# Altium PCB PCB1.PcbDoc (part 2 of 5)
Units mm, origin at the board's own origin, x right, y up, seen from the top; angles counter-clockwise.
Board outline 130 x 90 mm, 4 copper layers (Top Layer, Int 1 (GND), Int 2 (PWR), Bottom Layer), stack 1.466 mm thick; 419 components, 281 nets, 1355 pads, 522 vias.
Unrouted connection lines stored in the file: 26.
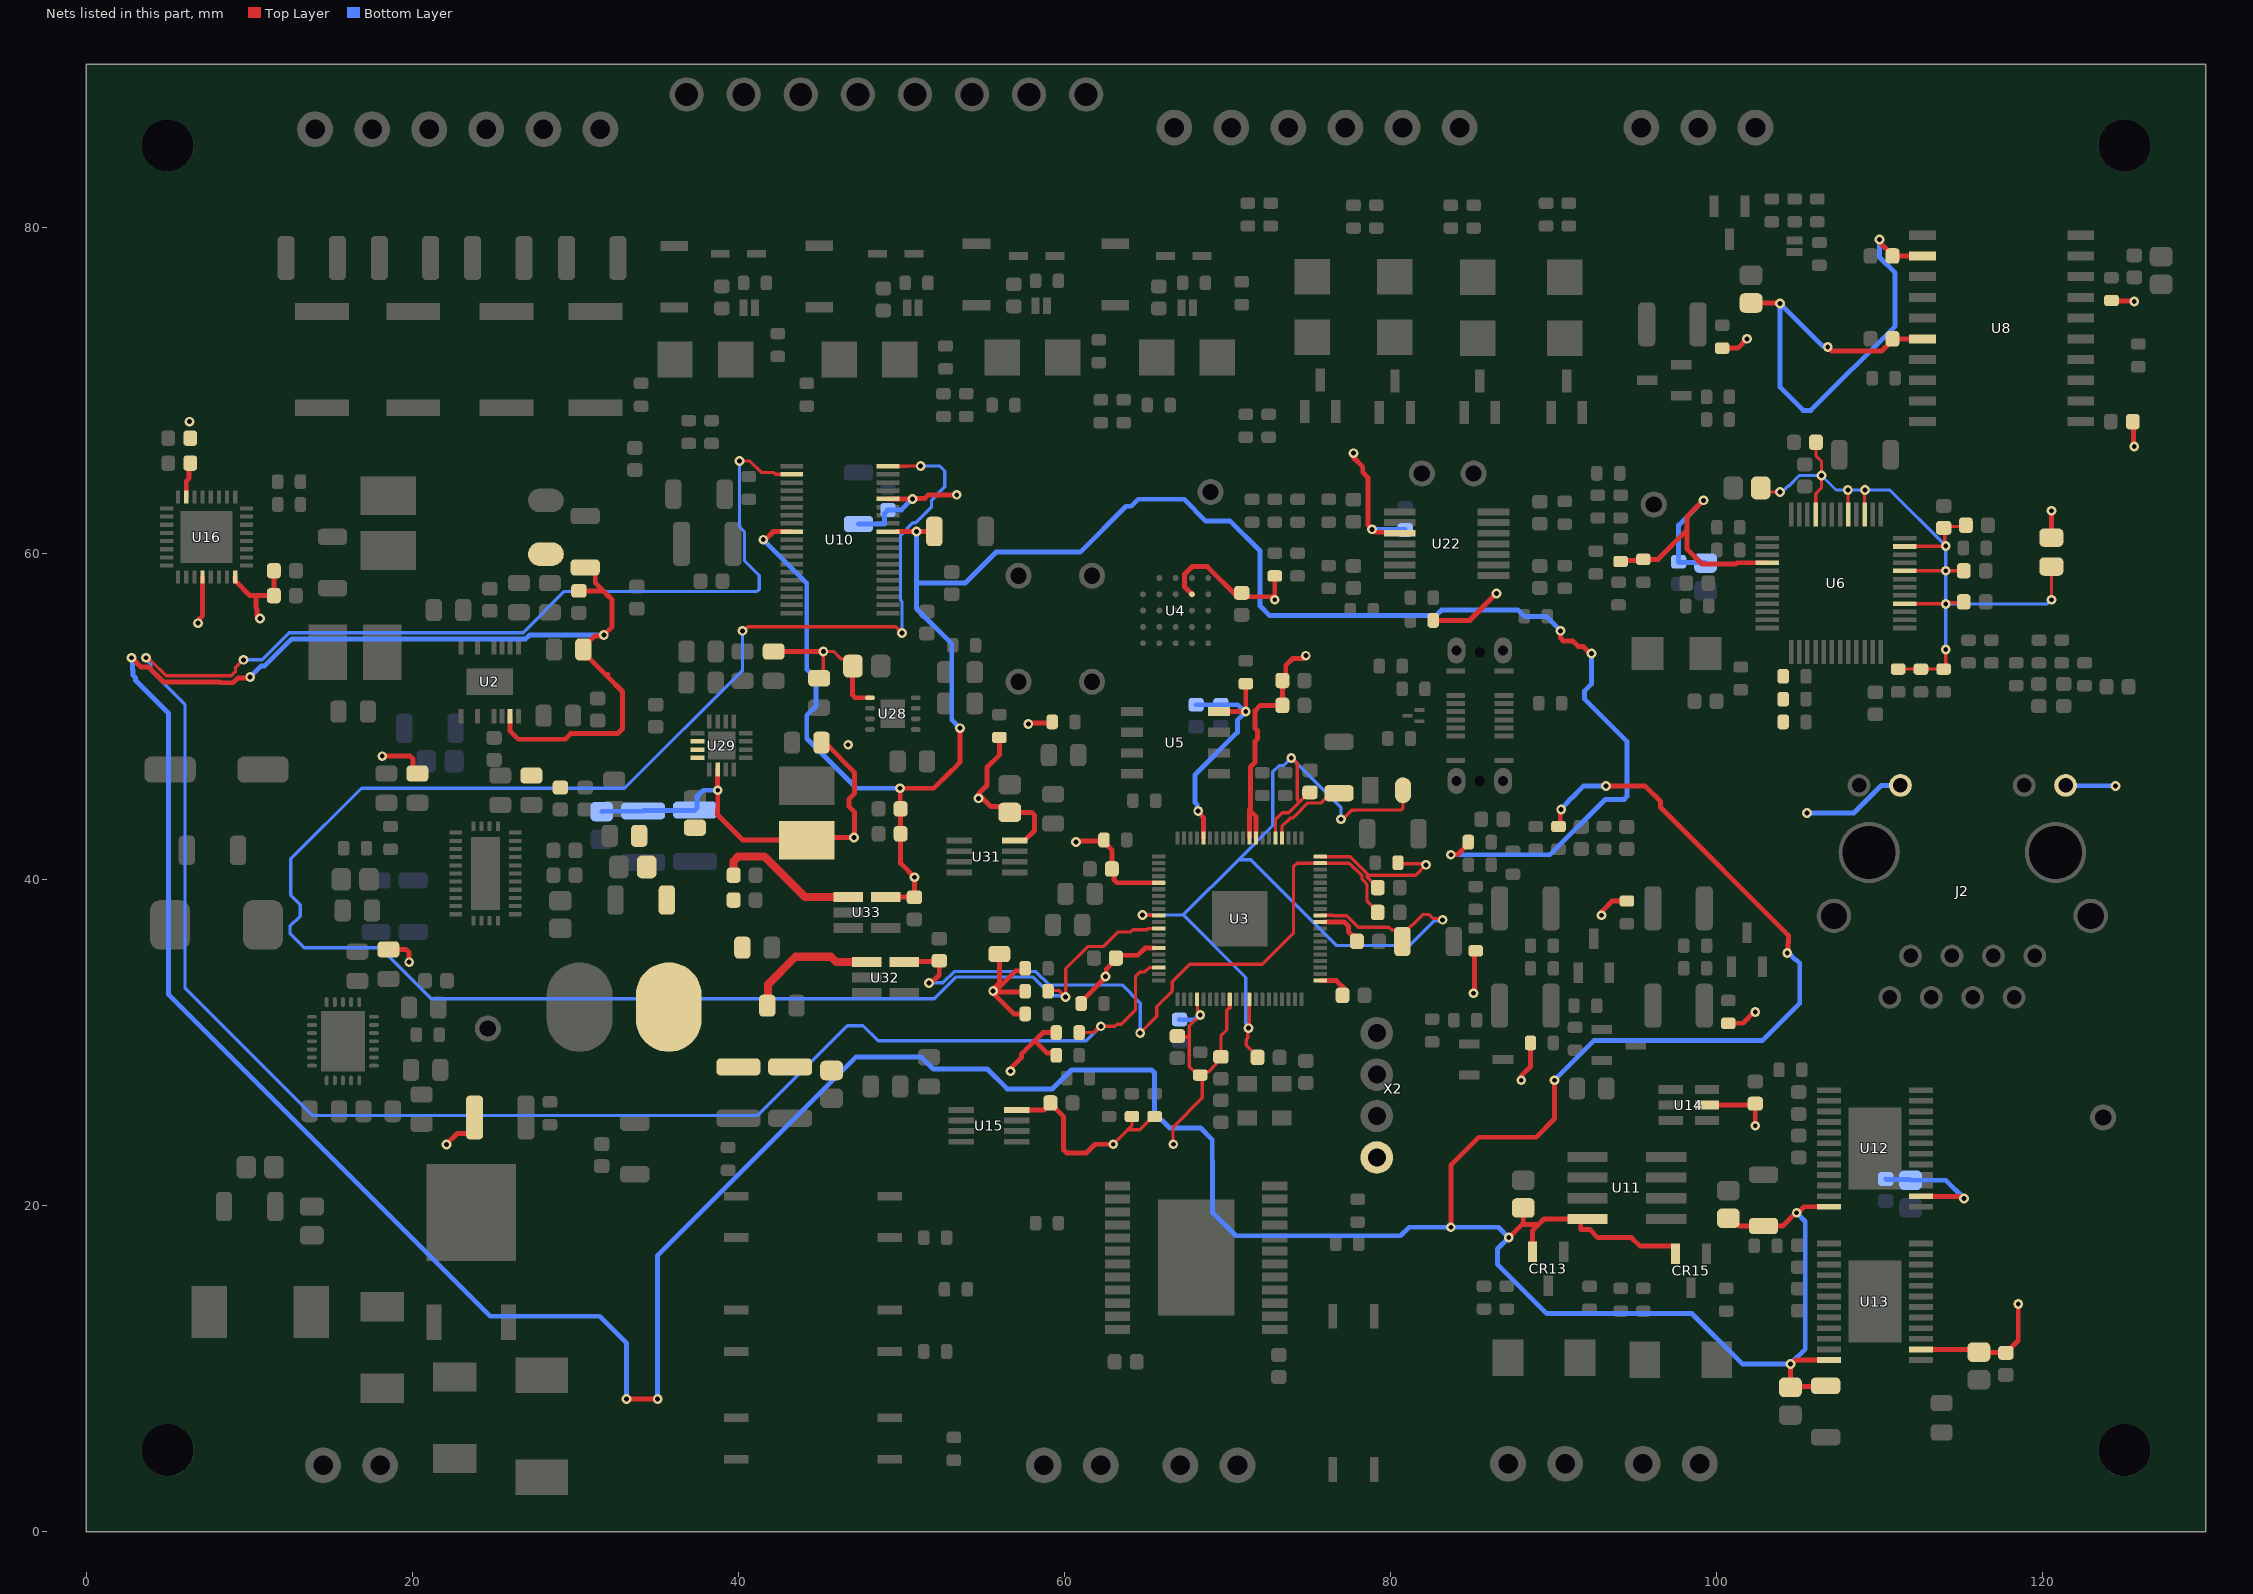
[diagram p4: the nets of this part, all layers, seen from the top]

## Footprints (in the part's own frame and the unit in brackets; to place one, negate y for a bottom-side part, rotate by r counter-clockwise, add the part's x,y. Pads: shape width x height; smd on the part's side, far side on the other; paste and mask are expansions set on the pad) (continued)
"CON: DG350-3.5-03P" [mm]
  round 2.2 hole 1.2: 1(-3.5,0) 2(0,0) 3(3.5,0)
  round 0.5 on Top Overlay: ""(-4.85,-2.9)
  silkscreen extent -5.35,-3.4 5.35,3.4, body extent -5.75,-3.4 5.75,3.4, height 8.4
"CON: DG350-3.5-06P" [mm]
  round 2.2 hole 1.2: 1(-8.75,0) 2(-5.25,0) 3(-1.75,0) 4(1.75,0) 5(5.25,0) 6(8.75,0)
  round 0.5 on Top Overlay: ""(-10.1,-2.9)
  silkscreen extent -10.6,-3.4 10.6,3.4, body extent -11,-3.4 11,3.4, height 8.42
"CON: JUMPER x1" [mm]
  rect 0.5x1 smd: 1(0,0) 2(0.7,0)
  silkscreen extent -0.45,-0.7 1.15,0.7
"CON: WF-04" [mm]
  round 2 hole 1.1: 1(0,0) 2(2.54,0) 3(5.08,0) 4(7.62,0)
  round 0.5 on Mech1: ""(-0.8,2)
  silkscreen extent -1.4,-3.3 8.9,2.6, body extent -1.33,-3.27 8.83,2.53, height 11.66
CONN12_TMJD4012BENL_TAL [mil]
  round 55 hole 35 paste-99999 mask+0: 1(0,0) 2(-50,-100) 3(-100,0) 4(-150,-100) 5(-200,0) 6(-250,-100) 7(-300,0) 8(-350,-100) 9(74.41,411.81) 10(-25.59,411.81) 11(-324.41,411.81) 12(-424.41,411.81)
  round 148 hole 128 paste-99999 mask-74: 13(-400,250) 15(50,250)
  round 83 hole 63 paste-99999 mask-41.5: 14(-485.04,96.85) 16(135.04,96.85)
  silkscreen extent -495,-155 251,520
CONN_USB4145-03-0230-C_GCT [mil]
  oval 63x43 hole 24 slot 43 at 0 deg paste-99999 mask-31.5: 17(-157.48,56.3) 18(157.48,56.3) 19(-157.48,-56.3) 20(157.48,-56.3)
  round 26 hole 26 unplated paste-99999 mask+0: 21(-157.48,0) S_1_H1(153.48,0)
  rect 12x45 smd paste+0 mask+0: A1(-108.27,58.46) A4(-49.21,58.46) A5(-29.53,58.46) A6(-9.84,58.46) A7(9.84,58.46) A8(29.53,58.46) A9(49.21,58.46) A12(108.27,58.46) B1(108.27,-58.46) B4(49.21,-58.46) B5(29.53,-58.46) B6(9.84,-58.46) B7(-9.84,-58.46) B8(-29.53,-58.46) B9(-49.21,-58.46) B12(-108.27,-58.46)
  silkscreen extent -266,-67 181,73
D0008A-IPC_A [mm]
  rect 2.469x0.622 smd paste+0 mask+0: 1(-2.414,1.905) 2(-2.414,0.635) 3(-2.414,-0.635) 4(-2.414,-1.905) 5(2.414,-1.905) 6(2.414,-0.635) 7(2.414,0.635) 8(2.414,1.905)
  silkscreen extent -4.32,-2.45 0.68,2.45
D_POWERDI123 [mm]
  oval 1.45x2.2 smd: 1(-1.65,0) 2(1.65,0)
DBT38_TEX [mil]
  rect 55.28x11 smd paste+0 mask+0: 1(-116.14,177.17) 2(-116.14,157.48) 3(-116.14,137.8) 4(-116.14,118.11) 5(-116.14,98.43) 6(-116.14,78.74) 7(-116.14,59.06) 8(-116.14,39.37) 9(-116.14,19.69) 10(-116.14,0) 11(-116.14,-19.68) 12(-116.14,-39.37) 13(-116.14,-59.06) 14(-116.14,-78.74) 15(-116.14,-98.43) 16(-116.14,-118.11) 17(-116.14,-137.8) 18(-116.14,-157.48) 19(-116.14,-177.17) 20(116.14,-177.17) 21(116.14,-157.48) 22(116.14,-137.8) 23(116.14,-118.11) 24(116.14,-98.43) 25(116.14,-78.74) 26(116.14,-59.06) 27(116.14,-39.37) 28(116.14,-19.68) 29(116.14,0) 30(116.14,19.69) 31(116.14,39.37) 32(116.14,59.06) 33(116.14,78.74) 34(116.14,98.43) 35(116.14,118.11) 36(116.14,137.8) 37(116.14,157.48) 38(116.14,177.17)
  silkscreen extent -164,-198 164,198, body extent -130,-193 130,193, height 47
DBV0005A-IPC_A [mm]
  rect 1.805x0.612 smd paste+0 mask+0: 1(-1.15,0.95) 2(-1.15,0) 3(-1.15,-0.95) 4(1.15,-0.95) 5(1.15,0.95)
  silkscreen extent -3.03,-1.7 1.4,1.7
DBV6 [mil]
  rect 58x22 smd paste-29 mask-29: 1(-44,37.4) 2(-44,0) 3(-44,-37.4) 4(44,-37.4) 5(44,0) 6(44,37.4)
  silkscreen extent -9,-60 9,60, body extent -59,-60 59,60, height 57
DCT8 [mil]
  rect 61.5x14 smd paste-30.75 mask-31: 1(-66.75,38.39) 2(-66.75,12.8) 3(-66.75,-12.8) 4(-66.75,-38.39) 5(66.75,-38.39) 6(66.75,-12.8) 7(66.75,12.8) 8(66.75,38.39)
  silkscreen extent -57,-62 57,62, body extent -84,-62 84,62, height 51
DO-214AASMB_J-BEND_LTF [mm]
  rect 1.874x2.234 smd paste+0 mask+0: 1(-2.207,0) 2(2.207,0)
  Top Layer keep-out region: -1.219,-1.918 -1.219,1.918 1.219,1.918 1.219,-1.918
  Keep-Out Layer region: -1.219,-1.918 -1.219,1.918 1.219,1.918 1.219,-1.918
  silkscreen extent -4.11,-2.1 2.5,2.1
DPAK_STM [mil]
  rect 36.97x86.56 smd paste+0 mask+0: 1(-90,-214.5) 3(90,-214.5)
  rect 215x235 smd paste+0 mask+0: 2(0,50.5)
  silkscreen extent -135,-166 135,127, body extent -130,-244 130,154, height 94
DRB0008A [mm]
  oval 0.6x0.3 smd paste+0 mask+0.051: 1(-1.4,0.975) 2(-1.4,0.325) 3(-1.4,-0.325) 4(-1.4,-0.975) 5(1.4,-0.975) 6(1.4,-0.325) 7(1.4,0.325) 8(1.4,0.975)
  rect 1.5x1.75 smd paste-0.862 mask+0.051: 9(0,0)
  Top Layer region: -0.185,-1.5 -0.465,-1.5 -0.465,-0.875 -0.75,-0.875 -0.75,0.875 -0.465,0.875 -0.465,1.5 -0.185,1.5 -0.185,0.875 0.185,0.875 0.185,1.5 0.465,1.5 0.465,0.875 0.75,0.875 0.75,-0.875 0.465,-0.875 0.465,-1.5 0.185,-1.5 0.185,-0.875 -0.185,-0.875
  silkscreen extent -1.73,-1.73 1.73,1.73
DRT3 [mm]
  rect 0.22x0.6 smd paste+0 mask+0: 1(-0.35,-0.371) 2(0.35,-0.371) 3(0,0.371)
  silkscreen extent -1.92,-0.65 0.65,0.55, body extent -0.52,-0.52 0.52,0.52, height 0.5
FUSE_PTS1206_EAT [mm]
  rect 0.634x1.703 smd paste+0 mask+0: 1(-1.886,0) 2(1.886,0)
  silkscreen extent -1.29,-1.03 1.29,1.03
L_0805 [mm] "Chip Inductor, 2-Leads, Body 2.00x1.25mm, IPC Medium Density"
  rrect50% 1.13x1.47 smd: 1(-0.885,0) 2(0.885,0)
  body extent -1.1,-0.72 1.1,0.72, height 1
L_AOTA_B201610 [mm]
  rect 1x1.6 smd: 1(-1,0)
  oval 1x1.6 smd: 2(1,0)
  silkscreen extent -1.35,1.05 -0.75,1.05
L_XFL4020 [mm]
  rect 2.37x3.4 smd: 1(-1.675,0) 2(1.675,0)
  silkscreen extent -2,-2 2,2
L_XGL4020 [mm]
  rect 2.37x3.4 smd: 1(-1.675,0) 2(1.675,0)
  silkscreen extent -2,-2 2,2
L_XGL6030 [mm]
  oval 4.04x5.5 smd: 1(-2.755,-0.6) 2(2.715,-0.6)
  silkscreen extent -3.27,-3.96 3.24,2.75
LED_PLCC2_3528 [mm] "Chip Capacitor, 2-Leads, Body 3.20x2.50mm, IPC Medium Density"
  rrect50% 1.05x2.7 smd: 1(-1.575,0) 2(1.575,0)
  silkscreen extent -1.91,-1.25 0.65,1.52, body extent -1.8,-1.4 1.8,1.4, height 2.7
MSE_16A_ADI [mil]
  rect 35x12 smd paste+0 mask+0: 1(-83,68.95) 3(-83,29.55) 5(-83,-9.85) 6(-83,-29.55) 7(-83,-49.25) 8(-83,-68.95) 9(83,-68.95) 10(83,-49.25) 11(83,-29.55) 12(83,-9.85) 14(83,29.55) 16(83,68.95)
  rect 65x112 smd paste-55.5 mask+0: 17(0,0)
  silkscreen extent -123,-84 57,84, body extent -87,-79 87,79, height 43
POWERSSO-24_STM [mil]
  rect 60.56x21.97 smd paste+0 mask+0: 1(-190,173.25) 2(-190,141.75) 3(-190,110.25) 4(-190,78.75) 5(-190,47.25) 6(-190,15.75) 7(-190,-15.75) 8(-190,-47.25) 9(-190,-78.75) 10(-190,-110.25) 11(-190,-141.75) 12(-190,-173.25) 13(190,-173.25) 14(190,-141.75) 15(190,-110.25) 16(190,-78.75) 17(190,-47.25) 18(190,-15.75) 19(190,15.75) 20(190,47.25) 21(190,78.75) 22(190,110.25) 23(190,141.75) 24(190,173.25)
  rect 185x280 smd paste-139.5 mask+0: 25(0,0)
  silkscreen extent -240,-212 240,212, body extent -206,-206 206,206, height 97
PW0014A-IPC_A [mm]
  rect 1.955x0.421 smd paste+0 mask+0: 1(-2.875,1.95) 2(-2.875,1.3) 3(-2.875,0.65) 4(-2.875,0) 5(-2.875,-0.65) 6(-2.875,-1.3) 7(-2.875,-1.95) 8(2.875,-1.95) 9(2.875,-1.3) 10(2.875,-0.65) 11(2.875,0) 12(2.875,0.65) 13(2.875,1.3) 14(2.875,1.95)
  silkscreen extent -4.57,-2.5 1.4,2.5
QFN40P1000X1000X85-81N [mm]
  rrect25% 0.81x0.25 smd: 1(-4.95,3.8) 2(-4.95,3.4) 3(-4.95,3) 4(-4.95,2.6) 5(-4.95,2.2) 6(-4.95,1.8) 7(-4.95,1.4) 8(-4.95,1) 9(-4.95,0.6) 10(-4.95,0.2) 11(-4.95,-0.2) 12(-4.95,-0.6) 13(-4.95,-1) 14(-4.95,-1.4) 15(-4.95,-1.8) 16(-4.95,-2.2) 17(-4.95,-2.6) 18(-4.95,-3) 19(-4.95,-3.4) 20(-4.95,-3.8) 41(4.95,-3.8) 42(4.95,-3.4) 43(4.95,-3) 44(4.95,-2.6) 45(4.95,-2.2) 46(4.95,-1.8) 47(4.95,-1.4) 48(4.95,-1) 49(4.95,-0.6) 50(4.95,-0.2) 51(4.95,0.2) 52(4.95,0.6) 53(4.95,1) 54(4.95,1.4) 55(4.95,1.8) 56(4.95,2.2) 57(4.95,2.6) 58(4.95,3) 59(4.95,3.4) 60(4.95,3.8)
  rrect25% 0.25x0.81 smd: 21(-3.8,-4.95) 22(-3.4,-4.95) 23(-3,-4.95) 24(-2.6,-4.95) 25(-2.2,-4.95) 26(-1.8,-4.95) 27(-1.4,-4.95) 28(-1,-4.95) 29(-0.6,-4.95) 30(-0.2,-4.95) 31(0.2,-4.95) 32(0.6,-4.95) 33(1,-4.95) 34(1.4,-4.95) 35(1.8,-4.95) 36(2.2,-4.95) 37(2.6,-4.95) 38(3,-4.95) 39(3.4,-4.95) 40(3.8,-4.95) 61(3.8,4.95) 62(3.4,4.95) 63(3,4.95) 64(2.6,4.95) 65(2.2,4.95) 66(1.8,4.95) 67(1.4,4.95) 68(1,4.95) 69(0.6,4.95) 70(0.2,4.95) 71(-0.2,4.95) 72(-0.6,4.95) 73(-1,4.95) 74(-1.4,4.95) 75(-1.8,4.95) 76(-2.2,4.95) 77(-2.6,4.95) 78(-3,4.95) 79(-3.4,4.95) 80(-3.8,4.95)
  rect 3.4x3.4 smd paste-0.62: 81(0,0)
  silkscreen extent -6.06,-5 5,5, body extent -5,-5 5,5, height 0.9
R_0603 [mm] "Chip Resistor, 2-Leads, Body 1.60x0.80mm, IPC Medium Density"
  rrect50% 0.7x0.9 smd: 1(-0.7,0) 2(0.7,0)
  body extent -0.85,-0.45 0.85,0.45, height 0.55
R_0805 [mm] "Chip Resistor, 2-Leads, Body 2.00x1.25mm, IPC Medium Density"
  rrect50% 1x1.35 smd: 1(-0.9,0) 2(0.9,0)
  silkscreen extent -0.1,-0.58 0.1,0.58, body extent -1.05,-0.67 1.05,0.67, height 0.6
RE_24_ADI [mil]
  rect 57.56x13.97 smd paste+0 mask+0: 1(-111,140.75) 2(-111,115.16) 3(-111,89.57) 4(-111,63.98) 5(-111,38.39) 6(-111,12.79) 7(-111,-12.8) 8(-111,-38.39) 9(-111,-63.98) 10(-111,-89.57) 11(-111,-115.16) 12(-111,-140.75) 13(111,-140.75) 14(111,-115.16) 15(111,-89.57) 16(111,-63.98) 17(111,-38.39) 18(111,-12.8) 19(111,12.79) 20(111,38.39) 21(111,63.98) 22(111,89.57) 23(111,115.16) 24(111,140.75)
  rect 128x198 smd paste-98.5 mask+0: 25(0,0)
  silkscreen extent -160,-160 160,160, body extent -126,-156 126,156, height 47
RES_0FKEGHP_VIS [mil]
  rect 39.87x130 smd paste+0 mask+0: 1(-115.94,0) 2(115.94,0)
  Top Layer keep-out region: -90,-63 -90,63 90,63 90,-63
  Keep-Out Layer region: -90,-65 -90,65 90,65 90,-65
  silkscreen extent -84,-70 84,70, body extent -128,-65 128,65, height 28
RGT16_1P7X1P7 [mm]
  rect 0.85x0.28 smd paste+0 mask+0: 1(-1.475,0.75) 2(-1.475,0.25) 3(-1.475,-0.25) 4(-1.475,-0.75) 9(1.475,-0.75) 10(1.475,-0.25) 11(1.475,0.25) 12(1.475,0.75)
  rect 0.28x0.85 smd paste+0 mask+0: 5(-0.75,-1.475) 6(-0.25,-1.475) 7(0.25,-1.475) 8(0.75,-1.475) 13(0.75,1.475) 14(0.25,1.475) 15(-0.25,1.475) 16(-0.75,1.475)
  rect 1.7x1.7 smd paste-0.85 mask-0.838: 17(0,0)
  silkscreen extent -1.96,-1.96 2.41,1.96, body extent -1.63,-1.63 1.63,1.63, height 1
RHF0024A [mm]
  oval 0.6x0.24 smd paste+0 mask+0.051: 1(-1.9,1.5) 2(-1.9,1) 3(-1.9,0.5) 4(-1.9,0) 5(-1.9,-0.5) 6(-1.9,-1) 7(-1.9,-1.5) 13(1.9,-1.5) 14(1.9,-1) 15(1.9,-0.5) 16(1.9,0) 17(1.9,0.5) 18(1.9,1) 19(1.9,1.5)
  oval 0.24x0.6 smd paste+0 mask+0.051: 8(-1,-2.4) 9(-0.5,-2.4) 10(0,-2.4) 11(0.5,-2.4) 12(1,-2.4) 20(1,2.4) 21(0.5,2.4) 22(0,2.4) 23(-0.5,2.4) 24(-1,2.4)
  rect 2.7x3.7 smd paste-1.837 mask+0.051: 25(0,0)
  silkscreen extent -2.2,-2.7 2.2,2.7
RNP0030B [mm]
  rect 0.75x0.25 smd paste+0 mask+0.051: 1(-1.825,2.5) 2(-1.825,2) 3(-1.825,1.5) 4(-1.825,1) 5(-1.825,0.5) 6(-1.825,0) 7(-1.825,-0.5) 8(-1.825,-1) 9(-1.825,-1.5) 10(-1.825,-2) 11(-1.825,-2.5) 16(1.825,-2.5) 17(1.825,-2) 18(1.825,-1.5) 19(1.825,-1) 20(1.825,-0.5) 21(1.825,0) 22(1.825,0.5) 23(1.825,1) 24(1.825,1.5) 25(1.825,2) 26(1.825,2.5)
  rect 0.25x0.6 smd paste+0 mask+0.051: 12(-0.75,-2.9) 13(-0.25,-2.9) 14(0.25,-2.9) 15(0.75,-2.9) 27(0.75,2.9) 28(0.25,2.9) 29(-0.25,2.9) 30(-0.75,2.9)
  rect 1.8x4.5 smd paste-2.237 mask+0.051: 31(0,0)
  silkscreen extent -2.17,-3.18 2.17,3.18
SMBJSERIES_LTF [mil]
  rect 85.59x86 smd paste+0 mask+0: 1(-73.11,0) 2(73.11,0)
  Top Layer keep-out region: -108,45 -108,75.5 108,75.5 108,45
  Top Layer keep-out region: -108,-75.5 -108,-45 108,-45 108,-75.5
  Top Layer keep-out region: -28.32,-45 -28.32,45 28.32,45 28.32,-45
  Keep-Out Layer region: -28.32,-45 -28.32,45 28.32,45 28.32,-45
  silkscreen extent -180,-82 115,82, body extent -110,-77 110,77, height 98
SMC [mm] "Molded Diode, 2-Leads, Body 6.85x5.90mm, IPC Medium Density"
  rrect50% 2.45x3.05 smd: 1(-2.85,0) 2(2.85,0)
  silkscreen extent -3.6,-3.15 4.38,3.15, body extent -3.77,-3.11 3.77,3.11, height 2.62
SOIC_2DFM_TEX [mil]
  rect 64.56x21.97 smd paste+0 mask+0: 1(-191,225) 2(-191,175) 3(-191,125) 4(-191,75) 5(-191,25) 6(-191,-25) 7(-191,-75) 8(-191,-125) 9(-191,-175) 10(-191,-225) 11(191,-225) 12(191,-175) 13(191,-125) 14(191,-75) 15(191,-25) 16(191,25) 17(191,75) 18(191,125) 19(191,175) 20(191,225)
  silkscreen extent -243,-260 243,260, body extent -209,-254 209,254, height 140
SOT23_SEM [mil]
  rect 22.36x51.56 smd paste+0 mask+0: 1(-37.4,-40) 2(37.4,-40) 3(0,40)
  silkscreen extent -65,-99 65,33, body extent -60,-52 60,52, height 44
SOT-23_3L_ONS [mil]
  rect 22.36x49.56 smd paste+0 mask+0: 1(-37.5,-41) 2(37.5,-41) 3(0,41)
  silkscreen extent -65,-99 65,33, body extent -60,-52 60,52, height 44
SOT-23_ONS [mil]
  rect 22.36x55.56 smd paste+0 mask+0: 1(-37.5,-38) 2(37.5,-38) 3(0,38)
  silkscreen extent -115,-57 65,32, body extent -60,-52 60,52, height 44
SOT-23TO-236_318-08_ONS [mil]
  rect 22.36x49.56 smd paste+0 mask+0: 1(-37.5,-41) 2(37.5,-41) 3(0,41)
  silkscreen extent -115,-57 65,33, body extent -60,-52 60,52, height 44
SW_B3F-1000 [mm]
  round 1.6 hole 1: 1(-3.25,2.25) 2(3.25,2.25) 3(-3.25,-2.25) 4(3.25,-2.25)
  silkscreen extent -4.1,-3.05 3.05,3.85, body extent -3.85,-3 3.85,3, height 4.3
TFBGA_128JVBIQ_WIN [mm]
  round 0.366 smd paste+0 mask+0: A2(-1,2) A3(0,2) A4(1,2) A5(2,2) B1(-2,1) B2(-1,1) B3(0,1) B4(1,1) B5(2,1) C1(-2,0) C2(-1,0) C3(0,0) C4(1,0) C5(2,0) D1(-2,-1) D2(-1,-1) D3(0,-1) D4(1,-1) D5(2,-1) E1(-2,-2) E2(-1,-2) E3(0,-2) E4(1,-2) E5(2,-2)
  silkscreen extent -3.3,-4.31 3.3,4.31, body extent -3.05,-4.05 3.05,4.05, height 1.2
XTAL_445I23D25M00000_CTS [mil]
  rect 77x79 smd paste+0 mask+0: 1(-70,0) 2(70,0)
  Top Layer keep-out region: -29.5,-41.5 -29.5,41.5 29.5,41.5 29.5,-41.5
  Top Layer keep-out region: -100.5,41.5 -100.5,65 100.5,65 100.5,41.5
  Top Layer keep-out region: -100.5,-65 -100.5,-41.5 100.5,-41.5 100.5,-65
  Keep-Out Layer region: -29.5,-41.5 -29.5,41.5 29.5,41.5 29.5,-41.5
  silkscreen extent -108,-72 108,72, body extent -113,-82 113,82, height 53

## Part data
CR1 CR2 CR4 CR5 CR6 CR7 CR16 CR17 CR18 CR19 F2: "No Description Available", Manufacturer_Name="Littelfuse Inc", Copyright="Copyright (C) 2026 Ultra Librarian. All rights reserved."
  CR1 CR2: Manufacturer_Part_Number=5.0SMDJ36CA
  CR4 CR5 CR6 CR7: Manufacturer_Part_Number=SMBJ12CA
  CR16 CR17 CR18 CR19: Manufacturer_Part_Number=SMBJ36CA
  F2: Manufacturer_Part_Number=0454005.MR
CR3: "Automotive 100 V, 10 A, DPAK Power Schottky Trench Rectifier", Manufacturer_Name=STMicroelectronics, Copyright="Copyright (C) 2026 Ultra Librarian. All rights reserved.", Datasheet=https://www.st.com/resource/en/datasheet/stpst10h100sb-y.pdf, Manufacturer_Part_Number=STPST10H100SBYTR, RefDes=RefDes, Type=Type
CR8 CR9 CR10 CR11: "No Description Available", Manufacturer_Name="Bourns Electronics", Copyright="Copyright (C) 2026 Ultra Librarian. All rights reserved.", Manufacturer_Part_Number=CDSOD323-T12C, RefDes=RefDes, Type=Type
CR12 CR14: "Description", Manufacturer_Name="Littelfuse Inc", Copyright="Copyright (C) 2025 Ultra Librarian. All rights reserved.", Manufacturer_Part_Number=SMBJ15A
CR13 CR15 U18 U19 U20 U21: "No Description Available", Manufacturer_Name=onsemi, Copyright="Copyright (C) 2026 Ultra Librarian. All rights reserved.", RefDes=RefDes, Type=Type
  CR13 CR15: Manufacturer_Part_Number=BAS70-04LT1G
  U18 U19 U20 U21: Manufacturer_Part_Number=BAS70LT1G
D3 D4 D5 D6 D7 D8 D9 D10 D11 D12: library part LED, AF=1, BV=0, BV_MAX=1e99, CJO=0, CJP=0, CTA=0, CTP=0, EG=1.11, FC=0.5, FCS=0.5, FV_MAX=1e99, IBV=0.001, IKF=0, IKR=0, IS=1e-14, ISR=1e-14, JSW=0, JTUN=0, JTUNSW=0, KEG=1, KF=0, LEVEL=1, MJSW=0.33, N=1, NBV=1, NR=1, NS=1, NTUN=30, PHP=1, RS=0, SimulationGenericComponent=True, TCV=0, TLEV=0, TLEVC=0, TM1=0, TM2=0, TNOM=27, TPB=0, TPHP=0, TRS=0, TRS2=0, TT=0, TTT1=0, TTT2=0, VJ=1, XTI=3, XTITUN=3
F1: CURRENT=2A, RESISTANCE=1m, SimulationGenericComponent=True
F3 F4 F5 F6: "No Description Available", Manufacturer_Name=Eaton, Copyright="Copyright (C) 2026 Ultra Librarian. All rights reserved.", Manufacturer_Part_Number=PTS120630V012
FB1: library part Resistor, "Resistor", SimulationGenericComponent=True, TC1=0, TC2=0
FB2: library part "Ferrite Chip", "SMT Ferrite Chip"
J1: "Description", Manufacturer_Name="Global Connector Technology", Copyright="Copyright (C) 2026 Ultra Librarian. All rights reserved.", Manufacturer_Part_Number=USB4145-03-0230-C, RefDes=RefDes, Type=Type
J2: "No Description Available", Manufacturer_Name="Taoglas Limited", Copyright="Copyright (C) 2026 Ultra Librarian. All rights reserved.", Manufacturer_Part_Number=TMJD4012BENL, RefDes=RefDes, Type="Modular Connector Jacks With Magnetics"
J3 J6 J7 J8 J9: library part Jumper_single, CommentText="\"Перемычка\""
J4: library part Connector_terminal_3pin, CurrentMax=10A, Manufacturer=Degson, PartNumber=DG350-3.5-03P-14, VoltageMax=300VAC, CommentText="\"Разъем\"", HelpURL=https://www.chipdip.ru/product/dg350-3.5-03p-12, Multichannel=3pin, Pitch=3.5mm, TypeConnector="Terminal connector", ValueManufacturerPartNumber="Terminal connector, 3pin, 3.5mm, 300VAC, 10A"
J5: library part Connector_terminal_8pin, CurrentMax=10A, Manufacturer=Degson, PartNumber=DG350-3.5-08P-14, VoltageMax=300VAC, CommentText="\"Разъем\"", HelpURL=https://www.compel.ru/infosheet/DEGSON/DG350-3.5-08P-14-00AH, Multichannel=6pin, Pitch=3.5mm, TypeConnector="Terminal connector", ValueManufacturerPartNumber="Terminal connector, 6pin, 3.5mm, 300VAC, 10A"
J10 J11 X1 X4 X5: library part Connector_terminal_2pin, CurrentMax=10A, Manufacturer=Degson, PartNumber=DG350-3.5-02P-14, VoltageMax=300VAC, CommentText="\"Разъем\"", HelpURL=https://www.chipdip.ru/product/dg350-3.5-02p-12, Multichannel=2pin, Pitch=3.5mm, TypeConnector="Terminal connector", ValueManufacturerPartNumber="Terminal connector, 2pin, 3.5mm, 300VAC, 10A"
MOSFET1 MOSFET2 MOSFET3 MOSFET4: library part TLP383GR-TPL,E, "Photocoupler (phototransistor output), DC input, 5000 Vrms, 4pin SO6L", Manufacturer_Name="Toshiba Electronic Devices & Storage Corp.", Number_devices_in_Package=1, Source_Package=TLP383, Copyright="Copyright (C) 2026 Ultra Librarian. All rights reserved.", Datasheet=https://toshiba.semicon-storage.com/info/docget.jsp?did=28830&prodName=TLP383, Manufacturer_Part_Number=TLP383(GR-TPL,E, RefDes=Refdes, Type=Type
R98 R99 R100 R101: "CRCW2512-HP 100 1K5 1% E67 E3", Manufacturer_Name=Vishay, Copyright="Copyright (C) 2026 Ultra Librarian. All rights reserved.", Datasheet=https://www.vishay.com/doc?20043, Manufacturer_Part_Number=CRCW25121K50FKEGHP, Type="Chip Resistor - Surface Mount"
SW1: "Tactile Switch SPST-NO Top Actuated Through Hole", Package=None, Availability="In Stock", Check_prices=https://www.snapeda.com/parts/B3F-1000/Omron+Electronics+Inc-EMC+Div/view-part/?ref=eda, MF=Omron, MP=B3F-1000, Price=None, Purchase-URL=https://pricing.snapeda.com/search/part/B3F-1000/?ref=eda, SnapEDA_Link=https://www.snapeda.com/parts/B3F-1000/Omron+Electronics+Inc-EMC+Div/view-part/?ref=snap
TP1 TP2 TP3 TP4 TP5 TP6: library part Connector_Test_Point, Manufacturer=Keystone, PartNumber=5001, HelpURL=https://www.digikey.com/product-detail/en/keystone-electronics/5001/36-5001-ND/255327, TypeConnector="Test point", ValueManufacturerPartNumber="Test point, Keystone, 5001"
U1: "4.2-V to 60-V, 150m&Omega;, 0.1-2.23A eFuse with integrated input reverse polarity protection 24-VQFN -40 to 125", Manufacturer_Name="Texas Instruments", Copyright="Copyright (C) 2026 Ultra Librarian. All rights reserved.", Datasheet=https://www.ti.com/lit/gpn/tps2660, Manufacturer_Part_Number=TPS26600RHFT, RefDes=RefDes, Type=TYPE
U2: library part LT8362EMSEPBF, "Low IQ Boost/SEPIC/Inverting Converter with 2A, 60V Switch", Manufacturer_Name="Analog Devices Inc", Copyright="Copyright (C) 2026 Ultra Librarian. All rights reserved.", Datasheet=https://www.analog.com/media/en/technical-documentation/data-sheets/lt8362.pdf, Manufacturer_Part_Number=LT8362EMSE#PBF, RefDes=RefDes, Type=Type
U3: "RP2350B Microcontroller from Raspberry Pi", ComponentLink1Description=Datasheet, ComponentLink1URL=https://datasheets.raspberrypi.com/rp2350/rp2350-datasheet.pdf
U4: "No Description Available", Manufacturer_Name=Winbond, Copyright="Copyright (C) 2026 Ultra Librarian. All rights reserved.", Manufacturer_Part_Number=W25Q128JVBIQ, RefDes=RefDes, Type=Memory
U5: "Description", Manufacturer_Name="AP Memory", Copyright="Copyright (C) 2025 Ultra Librarian. All rights reserved.", Manufacturer_Part_Number=APS6404L-3SQR-SN, RefDes=RefDes, Type=Type
U6: "Description", Manufacturer_Name=WIZnet, Copyright="Copyright (C) 2025 Ultra Librarian. All rights reserved.", Manufacturer_Part_Number=W5500, RefDes=RefDes, Type=Type
U7: "Dual 0.7-pF, 3.6-V, &plusmn;8-kV ESD protection diode with 5-A surge rating for USB 3.0 3-SOT-9X3 -40 to 85", Manufacturer_Name="Texas Instruments", Copyright="Copyright (C) 2026 Ultra Librarian. All rights reserved.", Manufacturer_Part_Number=TPD2EUSB30ADRTR, RefDes=RefDes, Type=Type
U8: "Low emissions, 5-kVrms, 12-Mbps isolated RS-485 transceiver with integrated DC/DC converter 20-SOIC -40 to 125", Manufacturer_Name="Texas Instruments", Copyright="Copyright (C) 2026 Ultra Librarian. All rights reserved.", Manufacturer_Part_Number=ISOW1432DFMR, RefDes=RefDes, Type="Digital Isolators"
U9: "Description", Manufacturer_Name=Semtech, Copyright="Copyright (C) 2025 Ultra Librarian. All rights reserved.", Manufacturer_Part_Number=SM712.TCT
U10: "16-bit, 500kSPS 8-channel single-supply SAR ADC with bipolar input ranges 38-TSSOP -40 to 125", Manufacturer_Name="Texas Instruments", Copyright="Copyright (C) 2026 Ultra Librarian. All rights reserved.", Manufacturer_Part_Number=ADS8688IDBTR, RefDes=RefDes, Type=Type
U11: "Dual, 40-V, 4.5-MHz, low-power operational amplifier 8-SOIC -40 to 125", Manufacturer_Name="Texas Instruments", Copyright="Copyright (C) 2025 Ultra Librarian. All rights reserved.", Manufacturer_Part_Number=OPA2991IDR, RefDes=RefDes, Type=TYPE
U12 U13: "Single Channel, 16-Bit, Current Source & Voltage Output DAC, HART Connectivity", Manufacturer_Name="Analog Devices Inc", Copyright="Copyright (C) 2026 Ultra Librarian. All rights reserved.", Datasheet=https://www.analog.com/media/en/technical-documentation/data-sheets/AD5412_5422.pdf, Manufacturer_Part_Number=AD5422BREZ, RefDes=RefDes, Type=Type
U14: "2-ch, 1.65-V to 5.5-V inverters 6-SOT-23 -40 to 125", Manufacturer_Name="Texas Instruments", Copyright="Copyright (C) 2025 Ultra Librarian. All rights reserved.", Manufacturer_Part_Number=SN74LVC2G04DBVR, RefDes=RefDes, Type=Type
U15 U31: "2-ch, 2-input 1.65-V to 5.5-V 32 mA drive strength AND gate 8-SSOP -40 to 125", Manufacturer_Name="Texas Instruments", Copyright="Copyright (C) 2026 Ultra Librarian. All rights reserved.", Manufacturer_Part_Number=SN74LVC2G08DCTR, RefDes=RefDes, Type=Type
U16: "Octal Industrial Digital Input with Diagnostics", Manufacturer_Name="Analog Devices Inc", Copyright="Copyright (C) 2026 Ultra Librarian. All rights reserved.", Manufacturer_Part_Number=MAX22190ATJ+, RefDes=RefDes, Type=Type
U17: "High efficiency, high-side switch with extended diagnostics and smart driving for capacitive loads", Manufacturer_Name=STMicroelectronics, Copyright="Copyright (C) 2026 Ultra Librarian. All rights reserved.", Datasheet=https://www.st.com/resource/en/datasheet/ips2050h.pdf, Manufacturer_Part_Number=IPS2050HTR, RefDes=RefDes, Type=Type
U22: "High-performance, quad low-voltage push-pull comparator 14-TSSOP -40 to 125", Manufacturer_Name="Texas Instruments", Copyright="Copyright (C) 2026 Ultra Librarian. All rights reserved.", Datasheet=https://www.ti.com/lit/gpn/tlv9034, Manufacturer_Part_Number=TLV9034PWR, RefDes=RefDes, Type=TYPE
U23 U24 U25 U26 U27: "Description", Manufacturer_Name=onsemi, Copyright="Copyright (C) 2026 Ultra Librarian. All rights reserved.", Manufacturer_Part_Number=2N7002LT1G, RefDes=RefDes, Type=Type
U28: "High-accuracy voltage supervisor with Integrated watchdog timer 8-SON -40 to 125", Manufacturer_Name="Texas Instruments", Copyright="Copyright (C) 2026 Ultra Librarian. All rights reserved.", Datasheet=https://www.ti.com/lit/gpn/tps3851, Manufacturer_Part_Number=TPS3851H33EDRBR, RefDes=RefDes, Type=TYPE
U29: "3-17V 3A Step-Down Converter with DCS-Control in 3x3 QFN Package 16-VQFN -40 to 125", Manufacturer_Name="Texas Instruments", Copyright="Copyright (C) 2026 Ultra Librarian. All rights reserved.", Datasheet=https://www.ti.com/lit/gpn/tps62130, Manufacturer_Part_Number=TPS62130RGTR, RefDes=RefDes, Type=Type
U30: "3.5V to 60V, 3.5A Synchronous Step-Down Voltage Converter 30-WQFN -40 to 125", Manufacturer_Name="Texas Instruments", Copyright="Copyright (C) 2025 Ultra Librarian. All rights reserved.", Manufacturer_Part_Number=LM76003RNPR, RefDes=RefDes, Type=TYPE
U32 U33: "300mA ultra-low-noise low-IQ low-dropout (LDO) linear regulator with high PSRR 5-SOT-23 -40 to 125", Manufacturer_Name="Texas Instruments", RefDes=RefDes, Type=TYPE
  U32: Copyright="Copyright (C) 2026 Ultra Librarian. All rights reserved.", Manufacturer_Part_Number=TPS7A2033PDBVR
  U33: Copyright="Copyright (C) 2025 Ultra Librarian. All rights reserved.", Manufacturer_Part_Number=TPS7A2050PDBVR
X2: library part WF-4, CurrentMax=3A, Manufacturer=Connfly, VoltageMax=250VAC, CommentText="\"Разъем\"", HelpURL=https://www.chipdip.ru/product/wf-4, Multichannel=4pin, PartNumber=WF-4, Pitch=2.54mm, TypeConnector=Connector, ValueManufacturerPartNumber="Connector, 4pin, 2.54mm, 250VAC, 3A"
X3 X6: library part Connector_terminal_6pin, CurrentMax=10A, Manufacturer=Degson, PartNumber=DG350-3.5-06P-14, VoltageMax=300VAC, CommentText="\"Разъем\"", HelpURL=https://www.compel.ru/infosheet/DEGSON/DG350-3.5-06P-14-00AH, Multichannel=6pin, Pitch=3.5mm, TypeConnector="Terminal connector", ValueManufacturerPartNumber="Terminal connector, 6pin, 3.5mm, 300VAC, 10A"
XTAL1: "No Description Available", Manufacturer_Name=Abracon, Copyright="Copyright (C) 2026 Ultra Librarian. All rights reserved.", Manufacturer_Part_Number=ABM8-12.000MHZ-B2-T, RefDes=RefDes, Type=Type
XTAL2: "Description", Manufacturer_Name="CTS Components", Copyright="Copyright (C) 2025 Ultra Librarian. All rights reserved.", Manufacturer_Part_Number=445I23D25M00000
C1 C2 C3 C4 C5 C6 C7 C8 C9 C10 C11 C12 C13 C14 C15 C16 C17 C18 C19 C20 C21 C22 C23 C24 C25 C26 C27 C28 C29 C30 C31 C32 C33 C34 C35 C36 C37 C38 C39 C40 C41 C42 C43 C44 C45 C46 C47 C48 C49 C50 C51 C52 C53 C54 C55 C56 C57 C58 C59 C60 C61 C62 C63 C64 C65 C66 C67 C68 C69 C70 C71 C72 C73 C74 C75 C76 C77 C78 C79 C80 C81 C82 C83 C84 C85 C86 C87 C88 C89 C90 C91 C92 C93 C94 C95 C96 C97 C98 C99 C100 C101 C102 C103 C104 C105 C106 C107 C108 C109 C110 C111 C112 C113 C114 C115 C116 C117 C118 C119 C120 C121 C122 C123 C124 C125 C126 L1 L2 L3 L4 L5: SimulationGenericComponent=True
D1 D2: AF=1, BV=0, BV_MAX=1e99, CJO=0, CJP=0, CTA=0, CTP=0, EG=1.11, FC=0.5, FCS=0.5, FV_MAX=1e99, IBV=0.001, IKF=0, IKR=0, IS=1e-14, ISR=1e-14, JSW=0, JTUN=0, JTUNSW=0, KEG=1, KF=0, LEVEL=1, MJSW=0.33, N=1, NBV=1, NR=1, NS=1, NTUN=30, PHP=1, RS=0, SimulationGenericComponent=True, TCV=0, TLEV=0, TLEVC=0, TM1=0, TM2=0, TNOM=27, TPB=0, TPHP=0, TRS=0, TRS2=0, TT=0, TTT1=0, TTT2=0, VJ=1, XTI=3, XTITUN=3
R1 R2 R3 R4 R5 R6 R7 R8 R9 R10 R11 R12 R13 R14 R15 R16 R17 R18 R19 R20 R21 R22 R23 R24 R25 R26 R27 R28 R29 R30 R31 R32 R33 R34 R35 R36 R37 R38 R39 R40 R41 R42 R43 R44 R45 R46 R47 R48 R49 R50 R51 R52 R53 R54 R55 R56 R57 R58 R59 R60 R61 R62 R63 R64 R65 R66 R67 R68 R69 R70 R71 R72 R73 R74 R75 R76 R77 R78 R79 R80 R81 R82 R83 R84 R85 R86 R87 R88 R89 R90 R91 R92 R93 R94 R95 R96 R97 R102 R103 R104 R105 R106 R107 R108 R109 R110 R111 R112 R113 R114 R115 R116 R117 R118 R119 R120 R121 R122 R123 R124 R125 R126 R127 R128 R129 R130 R131 R132 R133 R134 R135 R136 R137 R138 R139 R140 R141 R142 R143 R144 R145 R146 R147 R148 R149 R150 R151 R152 R153 R154 R155 R156 R157 R158 R159 R160 R161 R162 R163 R164 R165 R166 R167 R168 R169 R170 R171 R172 R173 R174 R175 R176 R177 R178 R179 R180 R181 R182 R183 R_RP1 R_RP2 R_RP3: SimulationGenericComponent=True, TC1=0, TC2=0

## Free pads (board coordinates)
  round 3.2 hole 3.2 unplated: 1(5,5) 2(125,5) 3(5,85) 4(125,85)

## Via types
v1: diameter 0.6, hole 0.3, Top Layer to Bottom Layer, tented both sides, 508 vias
v2: diameter 0.6, hole 0.3, Top Layer to Bottom Layer, 14 vias

## Nets (pads, with @x,y where several pads share a name; then routed paths per layer and width w, separated by ;. In a path a pad name is that pad's centre, name@x,y a point inside that pad or via, vN(x,y) a via of type N, cw(c..) or ccw(c..) an arc to the next point about the centre after c; other vN are vias at no path point)
+1V1_CORE: C29.2 C33.2 C34.2 L3.2 U3.10 U3.32 U3.51 U3.65 | length 70.1
  Top Layer w0.2: v1(64.779,37.82) 64.791,37.807 65.774,37.807 U3.10@65.786,37.795 ; v1@71.236,30.932 71.336,31.032 U3.32@71.336,32.645 ; v1(71.29,30.878) 71.246,30.834 71.246,30.278 71.146,30.178 71.146,29.829 71.842,29.133 C33.2@71.842,29.083 ; U3.65@72.936,42.545 72.936,43.655 73.365,44.084 73.752,44.084 74.335,44.667 ; v1(73.908,47.451) 73.961,47.451 74.282,47.13 74.282,44.914 74.335,44.862 74.335,44.667 ; C34.2@75.031,45.249 74.917,45.249 74.335,44.667 ; U3.51@75.686,37.795 76.477,37.795 76.502,37.77 77.312,37.77 78.015,37.067 79.9,37.067 80.065,36.902 80.332,36.902 C29.2@80.721,36.514 ; v1(76.962,43.688) 77.07,43.688 77.62,44.238 77.816,44.238 77.827,44.249 80.639,44.249 80.756,44.366 L3.2@80.756,45.466 ; C29.2@80.721,36.195 C29.2@80.721,36.514 ; v1(83.193,37.521) 83.116,37.598 82.608,37.598 82.359,37.846 81.972,37.846 80.721,36.595 C29.2@80.721,36.514
  Bottom Layer w0.2: v1(64.779,37.82) 67.284,37.82 ; v1(71.29,30.878) 71.29,30.986 71.12,31.157 71.12,33.984 67.284,37.82 ; v1(76.962,43.688) 76.962,44.396 v1(73.908,47.451) 73.442,46.986 73.16,46.986 72.771,46.597 72.771,43.307 70.675,41.212 ; v1(83.193,37.521) 83.116,37.444 82.656,37.444 81.153,35.941 76.708,35.941 71.438,41.212 70.675,41.212 ; 67.284,37.82 70.675,41.212
+3V3_ANALOG: C27.2 C125.1 U3.59 U32.5 | length 43.7
  Top Layer w0.2: v1(64.643,30.58) 65.666,31.602 65.666,32.204 66.611,33.15 66.611,33.718 67.691,34.798 72.136,34.798 74.041,36.703 74.041,40.767 74.269,40.995 U3.59@75.686,40.995 77.476,40.995 78.249,40.222 78.249,39.996 78.558,39.687 78.558,38.673 79.208,38.023 C27.2@79.208,37.973
  Top Layer w0.3: U32.5@50.165,34.925 50.209,34.969 52.154,34.969 52.197,35.012 52.324,34.885 52.324,34.137 51.899,33.712 51.746,33.712 v1(51.689,33.655)
  Bottom Layer w0.2: v1(51.689,33.655) 52.541,33.655 53.231,34.345 58.238,34.345 59.055,33.528 63.532,33.528 64.643,32.417 v1(64.643,30.58)
+3V3_DIG: C16.2 C17.2 C18.2 C19.2 C20.2 C21.2 C22.2 C23.2 C24.2 C25.2 C28.2 C35.2 C36.2 C37.2 C42.2 C47.2 C55.1 C65.2 C66.2 C76.2 C77.2 C78.2 C79.2 C88.2 C90.1 C91.1 C92.1 C95.1 C96.1 C103.2 C104.1 C106.1 C108.1 C110.1 C122.2 D7.1 FB2.2 J2.9 J2.11 L4.1 R3.1 R15.2 R16.2 R17.2 R20.2 R28.1 R29.1 R31.1 R32.1 R36.2 R37.2 R38.2 R55.1 R61.1 R67.1 R92.1 R93.1 R110.1 R111.1 R127.2 R129.2 R130.2 R131.2 R151.2 R152.2 R153.2 R154.2 R155.2 R157.1 R158.1 R160.1 R164.1 R170.1 U3.5 U3.15 U3.24 U3.29 U3.41 U3.50 U3.60 U3.64 U3.68 U3.69 U3.76 U4.B4 U5.8 U6.28 U10.34 U12.2 U13.2 U14.5 U15.8 U16.12 U16.16 U16.31 U22.3 U28.1 U29.14 U31.8 X2.4 | length 275.1
  Top Layer w0.2: R158.1@44.958,52.335 45.212,52.589 v1(45.212,53.975) 45.847,53.975 46.308,53.514 46.601,53.514 C106.1@47.029,53.086 ; v1(62.992,23.755) 63.878,24.641 ; R110.1@64.135,25.462 64.135,24.898 63.878,24.641 ; R111.1@65.532,25.462 65.432,25.462 64.611,24.641 63.878,24.641 ; v1(66.675,23.755) 66.658,23.772 66.658,24.802 68.453,26.597 R93.1@68.453,27.813 ; C23.2@66.929,30.393 66.969,30.353 67.651,30.353 ; U3.24@68.136,32.39 68.161,32.365 68.161,31.956 68.32,31.796 v1@68.32,31.688 ; v1(68.329,31.68) 68.312,31.68 67.651,31.019 67.651,30.353 ; 70.136,32.144 69.957,31.965 69.957,30.764 69.596,30.404 C24.2@69.596,29.123 69.29,28.817 69.29,28.65 68.845,28.205 68.67,28.205 68.453,27.988 R93.1@68.453,27.813 ; U3.64@73.336,42.545 73.336,43.25 73.845,43.759 74.001,43.759 74.108,43.866 74.931,44.689 75.756,44.689 76.355,45.288 C28.2@76.835,45.288 ; U3.60@75.686,41.395 77.536,41.395 78.574,40.357 78.574,40.217 ; C17.2@79.208,39.497 78.574,40.131 78.574,40.217 ; R20.2@80.456,41.021 80.52,40.957 82.106,40.957 v1(82.169,40.894) 81.534,40.259 78.77,40.259 78.754,40.243 78.6,40.243 78.574,40.217 ; 67.651,30.353 67.651,28.52 67.913,28.258 68.326,28.258 68.326,27.94 R93.1@68.453,27.813
  Top Layer w0.3: U16.31@6.144,63.444 6.144,64.429 6.322,64.607 6.322,65.465 C96.1@6.39,65.532 ; v1(6.858,55.713) 6.858,55.888 7.144,56.174 U16.12@7.144,58.547 ; U16.16@9.144,58.547 9.144,58.316 10.056,57.404 10.414,57.404 ; v1(10.668,56.007) 10.482,56.193 10.482,56.599 10.414,56.668 10.414,57.404 ; C91.1@11.517,58.928 C92.1@11.517,57.404 10.414,57.404 ; v1(18.161,47.558) 19.878,47.558 20.054,47.382 20.054,46.759 R164.1@20.32,46.493 ; R3.1@18.717,35.698 19.636,35.698 19.812,35.522 v1(19.812,34.925) ; v1(22.098,23.749) 22.769,24.42 23.459,24.42 23.825,24.786 D7.1@23.825,25.4 ; U29.14@38.727,46.736 38.731,46.732 38.731,45.47 v1(38.735,45.466) 38.735,44.277 38.727,44.269 38.727,43.95 40.259,42.418 44.172,42.418 L4.1@44.196,42.394 44.372,42.57 v1(47.092,42.57) ; R157.1@42.164,53.975 v1(45.212,53.975) ; R160.1@45.35,48.339 47.117,46.572 47.117,45.263 46.796,44.942 46.796,44.466 47.117,44.145 47.117,42.57 v1@47.105,42.557 ; C106.1@47.029,53.086 46.99,53.047 46.99,51.319 47.166,51.143 U28.1@48.074,51.143 ; U10.34@49.178,63.333 v1(50.673,63.333) 50.69,63.35 51.423,63.35 51.655,63.582 v1(53.393,63.582) ; v1(54.722,44.973) 54.722,45.236 55.245,45.759 55.245,46.863 56.007,47.625 R28.1@56.007,48.703 ; v1@54.722,45.085 54.872,45.085 55.492,44.465 56.103,44.465 C122.2@56.551,44.017 ; R170.1@56.007,35.422 56.007,33.663 55.626,33.282 v1(55.626,33.16) v1@55.626,33.02 ; C122.2@56.642,44.108 57.99,44.108 58.166,43.932 58.166,42.999 57.544,42.377 U31.8@56.94,42.377 ; v1(56.695,28.233) 56.695,28.408 57.375,29.087 57.375,29.3 58.174,30.099 ; U15.8@57.067,25.867 58.736,25.867 59.142,26.273 C90.1@59.142,26.289 59.142,26.239 59.944,25.437 59.944,23.417 60.141,23.22 61.337,23.22 61.872,23.755 v1(62.992,23.755) ; R16.2@57.593,31.75 56.896,31.75 v1@55.626,33.02 ; R67.1@57.593,33.147 57.529,33.084 v1@55.689,33.084 ; R15.2@57.593,34.544 57.448,34.399 57.005,34.399 v1@55.689,33.084 ; v1(57.785,49.53) 57.848,49.593 59.18,49.593 R31.1@59.244,49.657 ; R17.2@59.498,29.21 59.348,29.36 58.914,29.36 58.174,30.099 ; R61.1@59.498,30.607 58.682,30.607 58.174,30.099 ; v1(60.706,42.291) 60.77,42.355 62.546,42.355 62.546,42.177 62.905,41.818 C20.2@62.905,40.64 63.048,40.497 63.048,39.971 63.223,39.795 U3.5@65.531,39.795 ; R92.1@61.022,32.385 61.022,32.499 62.508,33.985 v1(62.508,34.053) ; v1@62.5,34.061 62.566,34.126 62.566,34.502 63.159,35.095 C21.2@63.159,35.179 ; C21.2@63.134,35.204 63.282,35.352 64.502,35.352 64.946,35.795 U3.15@65.531,35.795 ; U4.B4@67.818,57.483 67.36,57.941 67.36,58.724 67.818,59.182 68.767,59.182 70.613,57.336 72.712,57.336 v1(72.898,57.15) R129.2@72.898,58.609 ; v1(68.199,44.196) 68.199,44.115 68.536,43.778 U3.76@68.536,42.545 ; U5.8@69.474,50.292 v1(71.12,50.292) R29.1@71.12,52.005 R29.1@71.22,52.005 ; 70.136,32.144 U3.29@70.136,32.39 ; U3.69@71.336,42.545 71.336,44.274 ; U3.68@71.736,42.545 71.736,43.874 71.336,44.274 ; v1(74.803,53.721) 74.617,53.535 73.982,53.535 73.569,53.122 73.569,52.4 C22.2@73.366,52.197 C25.2@73.366,50.673 72.016,50.673 71.695,50.352 71.695,49.26 71.848,49.108 71.848,48.631 71.695,48.479 71.695,47.192 71.411,46.908 71.411,44.349 71.336,44.274 ; U3.41@75.686,33.795 76.671,33.795 77.176,33.29 C19.2@77.176,33.274 ; U3.50@75.941,37.395 77.156,37.395 77.41,37.141 77.41,36.807 77.938,36.279 C18.2@77.938,36.195 ; v1(77.724,66.138) 77.724,65.876 78.294,65.305 78.294,64.962 78.613,64.643 78.613,61.722 v1(78.867,61.468) 79.046,61.289 80.503,61.289 U22.3@80.564,61.229 ; R127.2@82.615,55.88 84.836,55.88 v1(86.487,57.531) ; v1(85.09,33.02) 85.153,33.084 85.153,35.558 R153.2@85.217,35.622 ; v1(88.011,27.686) 88.011,27.948 88.581,28.518 R151.2@88.581,29.972 ; v1(92.94,37.804) 92.94,38.025 93.588,38.673 R152.2@94.488,38.673 ; R131.2@94.107,59.498 94.172,59.563 95.439,59.563 R130.2@95.504,59.628 96.398,59.628 98.171,61.401 ; v1(99.187,63.246) 98.171,62.23 98.171,61.401 ; U14.5@99.416,26.162 102.275,26.162 C88.2@102.362,26.249 v1(102.362,24.892) ; R154.2@100.33,72.579 101.281,72.579 v1(101.854,73.152) ; R155.2@100.711,31.177 101.611,31.177 102.311,31.877 v1(102.362,31.877) ; U6.28@103.099,59.416 101.227,59.416 101.156,59.345 99.1,59.345 98.171,60.274 98.171,61.401 ; U13.2@112.522,11.176 C77.2@115.697,11.176 ; U12.2@112.522,20.574 112.549,20.547 115.058,20.547 v1(115.171,20.434) ; C77.2@116.078,11.01 116.102,10.986 117.705,10.986 C79.2@117.729,10.962 117.745,10.962 118.015,11.232 118.015,11.248 118.491,11.724 v1(118.491,13.97) ; FB2.2@120.523,60.956 v1(120.523,62.611) ; R55.1@124.206,75.5 124.237,75.469 125.572,75.469 v1(125.603,75.438) ; C55.1@125.516,68.072 125.559,68.028 125.559,66.592 v1(125.603,66.548) ; v1@55.626,33.02 v1@55.689,33.084
  Bottom Layer w0.3: C104.1@31.623,44.157 31.643,44.176 34.143,44.176 C110.1@34.163,44.196 34.189,44.222 37.312,44.222 C108.1@37.338,44.247 37.465,44.374 37.465,45.085 37.846,45.466 v1(38.735,45.466) ; C65.2@47.371,61.798 48.973,61.798 48.973,62.453 C66.2@49.178,62.658 49.998,62.658 v1(50.673,63.333) ; C16.2@67.056,31.409 67.073,31.392 67.981,31.392 68.269,31.68 v1(68.329,31.68) ; C36.2@68.072,50.713 C37.2@69.596,50.713 70.618,50.713 71.039,50.292 v1(71.12,50.292) 71.12,50.265 70.603,49.748 70.603,49.013 68.005,46.415 68.005,44.72 68.142,44.583 68.142,44.253 v1(68.199,44.196) ; v1(78.867,61.468) 78.887,61.448 80.879,61.448 C103.2@80.899,61.428 ; v1(99.187,63.246) 97.663,61.722 C47.2@97.663,59.476 97.702,59.436 99.275,59.436 C42.2@99.314,59.397 C42.2@99.34,59.371 ; v1(105.537,44.069) 108.407,44.069 110.104,45.766 J2.11@111.267,45.766 ; C78.2@110.363,21.63 110.402,21.59 111.848,21.59 C76.2@111.887,21.551 114.054,21.551 v1(115.171,20.434) ; J2.9@121.397,45.766 121.42,45.743 124.437,45.743 v1(124.46,45.72)
  other v1: 46.736,48.26 6.35,68.072
+3V3_ETH_A: C39.1 C40.1 C41.1 C46.1 C48.1 C49.1 FB2.1 R46.2 R50.2 R51.2 U6.4 U6.8 U6.11 U6.15 U6.17 U6.21 | length 53.2
  Top Layer w0.2: C49.1@102.704,64.008 102.958,63.754 v1(103.886,63.754) ; U6.21@106.065,62.382 106.065,63.647 106.426,64.008 v1(106.426,64.77) 106.426,65.652 106.085,65.993 C41.1@106.085,66.802 ; v1(108.04,63.881) 108.053,63.869 108.053,62.395 U6.17@108.065,62.382 ; U6.15@109.065,62.382 109.065,63.853 v1(109.093,63.881) v1@109.093,64.135 ; R50.2@111.125,52.897 112.649,52.897 114.046,52.897 v1(114.046,54.102) ; U6.4@111.531,56.916 111.541,56.906 114.031,56.906 v1(114.046,56.891) ; U6.8@111.531,58.916 111.537,58.922 114.04,58.922 v1(114.046,58.928) C40.1@115.149,58.928 ; U6.11@111.531,60.416 111.549,60.434 114.028,60.434 v1(114.046,60.452) 113.983,60.515 113.983,61.492 C39.1@113.919,61.555 114.003,61.639 115.193,61.639 C46.1@115.276,61.722 ; v1@114.046,56.896 114.109,56.959 115.086,56.959 C48.1@115.149,57.023 ; v1(120.523,57.15) FB2.1@120.523,59.186
  Bottom Layer w0.2: v1(103.886,63.754) 103.994,63.754 104.36,64.12 104.418,64.12 105.068,64.77 v1(106.426,64.77) 107.315,63.881 v1(108.04,63.881) v1(109.093,63.881) 110.617,63.881 v1(114.046,60.452) v1(114.046,58.928) v1(114.046,56.891) ; v1(114.046,54.102) v1(114.046,56.891) ; v1(120.523,57.15) 120.264,56.891 v1(114.046,56.891)
+3V3_RS485_ISO: C57.1 C58.2 C59.2 U8.12 U8.16 | length 35.9
  Top Layer w0.3: C59.2@102.108,75.35 103.72,75.35 103.759,75.311 v1(103.886,75.311) ; v1(106.807,72.644) 107.049,72.402 110.118,72.402 110.784,73.068 C57.1@110.784,73.152 U8.16@112.624,73.152 ; v1(109.982,79.248) 110.039,79.191 110.039,79.027 110.784,78.282 C58.2@110.784,78.232 U8.12@112.624,78.232
  Bottom Layer w0.3: v1(106.807,72.644) 106.75,72.701 106.496,72.701 v1(103.886,75.311) 103.886,70.18 105.299,68.767 105.775,68.767 110.938,73.93 110.938,77.2 109.982,78.156 v1(109.982,79.248)
+5V_ANALOG: C60.2 C64.2 C67.2 C126.1 R25.2 U10.9 U10.30 U33.5 | length 127.2
  Top Layer w0.3: v1(41.529,60.833) 41.586,60.89 41.713,60.89 42.156,61.333 U10.9@43.278,61.333 ; U33.5@49.029,38.923 49.04,38.912 50.789,38.912 C126.1@50.8,38.902 v1(50.8,40.132) 49.951,40.981 C64.2@49.951,42.799 C67.2@49.951,44.323 49.931,44.343 49.931,45.573 v1(49.911,45.593) 51.994,45.593 53.07,46.669 53.087,46.669 53.424,47.006 53.424,47.023 53.594,47.193 v1(53.594,49.276) ; U10.30@49.73,61.341 v1(50.927,61.341) C60.2@52.019,61.341 ; v1(83.693,41.512) 83.71,41.529 84.109,41.529 84.771,42.191 R25.2@84.771,42.291 ; v1(90.424,55.245) 90.425,55.244 90.425,54.786 90.601,54.61 91.186,54.61 91.502,54.294 91.802,54.294 92.248,53.848 v1(92.329,53.848)
  Bottom Layer w0.3: v1(41.529,60.833) 44.196,58.166 44.196,52.878 44.761,52.313 44.761,50.623 44.196,50.058 44.196,48.641 47.244,45.593 v1(49.911,45.593) ; v1(50.927,61.341) 50.927,58.166 ; v1(53.594,49.276) 53.086,49.784 53.086,54.442 50.927,56.601 50.927,58.166 ; v1(83.693,41.512) 89.772,41.512 93.151,44.891 93.354,44.891 93.361,44.898 94.312,44.898 94.488,45.074 94.488,48.463 92.218,50.733 91.881,51.07 91.881,51.546 92.329,51.994 v1(92.329,53.848) ; v1(90.424,55.245) 89.541,56.128 88.206,56.128 87.821,56.513 83.121,56.513 82.801,56.193 72.568,56.193 71.988,56.773 71.988,60.143 70.155,61.976 68.673,61.976 67.338,63.311 64.522,63.311 64.097,62.886 63.775,62.886 60.96,60.071 55.804,60.071 53.899,58.166 50.927,58.166
+5V_PRE: C116.1 C117.2 C118.1 C119.2 C120.1 C121.2 C123.2 C124.2 L5.2 R171.2 R172.2 R173.2 R177.1 R178.1 U29.10 U29.11 U29.12 U32.1 U33.1 | length 17.2
  Top Layer w0.5: C123.2@39.711,40.259 39.697,40.273 39.697,41.109 39.99,41.402 41.605,41.402 44.084,38.923 U33.1@46.729,38.923 ; R177.1@41.772,32.258 41.811,32.297 41.811,33.556 43.509,35.254 45.689,35.254 46.019,34.925 U32.1@47.864,34.925
+15V_AO: C11.2 C13.2 C80.1 C81.1 C83.1 C84.1 C89.1 CR13.2 CR15.2 D2.2 R12.2 R23.2 U2.7 U11.8 U12.24 U13.24 | length 308.9
  Top Layer w0.3: v1(2.794,53.594) 3.37,53.018 3.847,53.018 4.75,52.115 8.207,52.115 8.263,52.059 9.009,52.059 9.153,52.203 9.164,52.203 9.324,52.363 10.006,52.363 v1(10.064,52.42) ; U2.7@26.005,50.013 26.005,49.097 26.505,48.597 29.375,48.597 29.717,48.939 32.588,48.939 32.893,49.244 32.893,51.525 31.922,52.496 ; C11.2@30.226,57.698 31.71,57.698 ; C13.2@30.802,59.213 31.227,58.789 31.227,58.181 31.71,57.698 ; 32.004,52.578 31.922,52.496 ; 32.004,57.404 31.71,57.698 ; 32.009,57.409 32.258,57.16 32.258,55.499 31.693,54.934 31.202,54.934 30.491,54.223 30.491,53.927 31.922,52.496 ; v1(33.147,8.128) v1(35.052,8.128) ; v1(83.693,18.669) 83.693,22.479 85.404,24.19 88.928,24.19 90.043,25.305 v1(90.043,27.686) ; v1(87.249,18.034) 88.043,18.828 ; C89.1@88.138,19.851 88.138,18.923 88.043,18.828 ; CR13.2@88.709,17.17 88.709,18.479 89.059,18.828 ; R23.2@90.297,43.245 90.404,43.352 90.404,44.237 v1(90.462,44.294) ; U11.8@92.074,19.177 U11.8@91.82,19.177 ; v1(93.218,45.72) 95.617,45.72 96.551,44.785 96.551,44.419 104.394,36.576 104.394,36.091 104.383,36.08 104.383,35.549 v1(104.325,35.491) ; CR15.2@97.472,17.043 97.472,17.389 97.338,17.523 95.28,17.523 94.769,18.034 92.71,18.034 92.202,18.542 91.659,18.542 91.659,19.016 U11.8@91.82,19.177 ; C81.1@100.711,19.216 100.892,19.216 101.363,18.745 C84.1@102.87,18.745 104.045,18.745 104.858,19.558 104.983,19.558 105.349,19.924 U12.24@106.883,19.924 ; C83.1@106.68,8.941 106.635,8.896 104.566,8.896 104.521,8.941 v1(104.521,10.287) 104.602,10.287 104.841,10.526 U13.24@106.883,10.526 ; 88.043,18.828 89.059,18.828 ; 89.059,18.828 89.408,19.177 U11.8@91.82,19.177
  Bottom Layer w0.3: v1(2.794,53.594) 2.851,53.537 2.851,52.855 2.871,52.836 2.871,52.518 3.034,52.355 3.034,52.205 5.063,50.175 5.063,32.932 24.787,13.208 31.496,13.208 33.147,11.557 v1(33.147,8.128) ; v1(10.064,52.42) 10.735,53.092 10.948,53.092 12.61,54.754 26.963,54.754 27.2,54.991 v1(31.75,54.991) ; v1(35.052,8.128) 35.052,16.947 47.204,29.099 51.226,29.099 51.951,28.374 55.267,28.374 56.484,27.157 59.267,27.157 60.432,28.322 65.339,28.322 65.515,28.146 65.515,25.691 66.451,24.755 68.356,24.755 69.066,24.045 69.066,22.749 69.071,22.744 69.071,19.595 70.522,18.144 80.608,18.144 81.133,18.669 v1(83.693,18.669) 86.614,18.669 v1(87.249,18.034) 86.547,17.332 86.547,16.399 89.574,13.372 98.485,13.372 101.57,10.287 v1(104.521,10.287) 105.427,11.193 105.427,19.022 104.902,19.547 v1(104.902,19.558) ; v1(90.043,27.686) 92.485,30.128 102.823,30.128 105.091,32.396 105.091,34.863 104.879,35.075 104.822,35.075 104.406,35.491 v1(104.325,35.491) ; v1(90.462,44.294) 91.07,44.964 91.826,45.72 v1(93.218,45.72)
ADC_CS_N: R67.2 U3.12 U10.38 | length 124.9
  Top Layer w0.2: v1(40.259,55.245) 40.322,55.245 40.576,55.499 49.657,55.499 v1(50.038,55.118) ; U10.38@49.178,65.333 50.381,65.333 50.396,65.348 v1(51.181,65.348) ; R67.2@58.993,33.147 59.037,33.191 59.643,33.191 59.855,32.979 59.858,32.979 60.054,32.783 v1(60.071,32.783) 60.071,34.535 61.415,35.879 62.13,35.879 62.383,35.879 63.274,36.77 64.046,36.77 64.196,36.92 65.081,36.92 65.156,36.995 U3.12@65.786,36.995
  Bottom Layer w0.2: v1(40.259,55.245) 40.259,52.832 33.02,45.593 16.891,45.593 12.556,41.258 12.556,39.036 13.135,38.457 13.135,37.753 12.502,37.121 12.502,36.686 13.374,35.814 18.034,35.814 21.168,32.68 52.026,32.68 53.366,34.02 58.055,34.02 59.215,32.86 59.994,32.86 v1(60.071,32.783) ; v1(50.038,55.118) 50.038,57.023 49.949,57.112 49.949,61.106 50.71,61.866 50.868,61.866 51.848,62.846 51.848,63.254 52.665,64.071 52.665,65.045 52.357,65.352 51.185,65.352 v1(51.181,65.348)
ADC_RST_PD_N: R61.2 U3.18 U10.2 | length 143.7
  Top Layer w0.2: v1(3.683,53.594) 3.791,53.594 3.992,53.393 4.002,53.393 4.905,52.49 8.909,52.49 9.161,52.742 9.161,52.976 v1(9.652,53.467) ; v1(40.071,65.659) 40.705,65.659 41.406,64.958 42.156,64.958 42.276,64.838 43.273,64.838 U10.2@43.278,64.833 ; R61.2@60.929,30.576 60.96,30.607 61.762,30.607 62.143,30.988 63.098,30.988 63.225,31.115 63.489,31.115 64.35,31.976 64.35,34.037 64.64,34.327 64.927,34.327 65.195,34.595 U3.18@65.786,34.595
  Bottom Layer w0.2: v1(3.683,53.594) 3.683,53.486 3.976,53.193 3.976,52.818 6.063,50.731 6.063,33.347 13.883,25.527 41.192,25.527 46.691,31.026 47.644,31.026 48.571,30.099 61.341,30.099 v1(62.23,30.988) ; v1(9.652,53.467) 10.792,53.467 12.454,55.129 26.808,55.129 29.337,57.658 41.148,57.658 41.275,57.785 41.275,58.637 40.379,59.533 40.379,61.309 40.071,61.618 v1(40.071,65.659)